# Altium PCB PCB1.PcbDoc
Units mm, origin at the board's own origin, x right, y up, seen from the top; angles counter-clockwise.
Board outline 85.01 x 50.25 mm, 2 copper layers (Top Layer, Bottom Layer); 30 components, 16 nets, 78 pads, 2 vias.
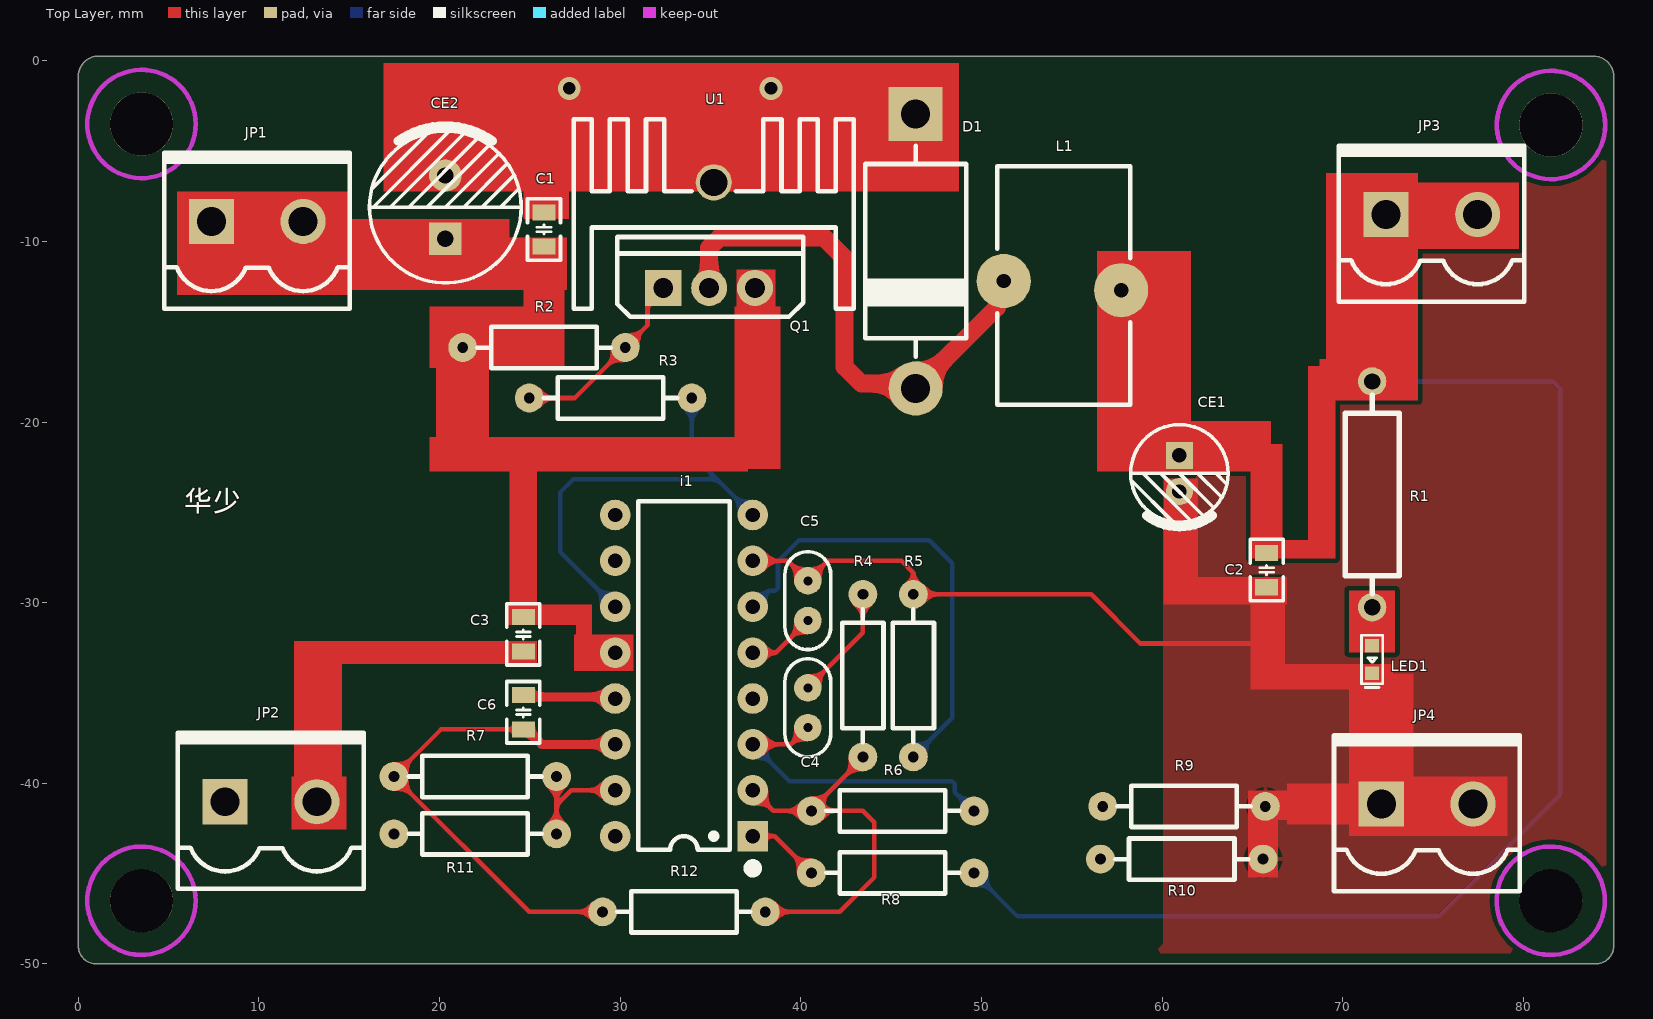
[diagram p0: Top Layer view]
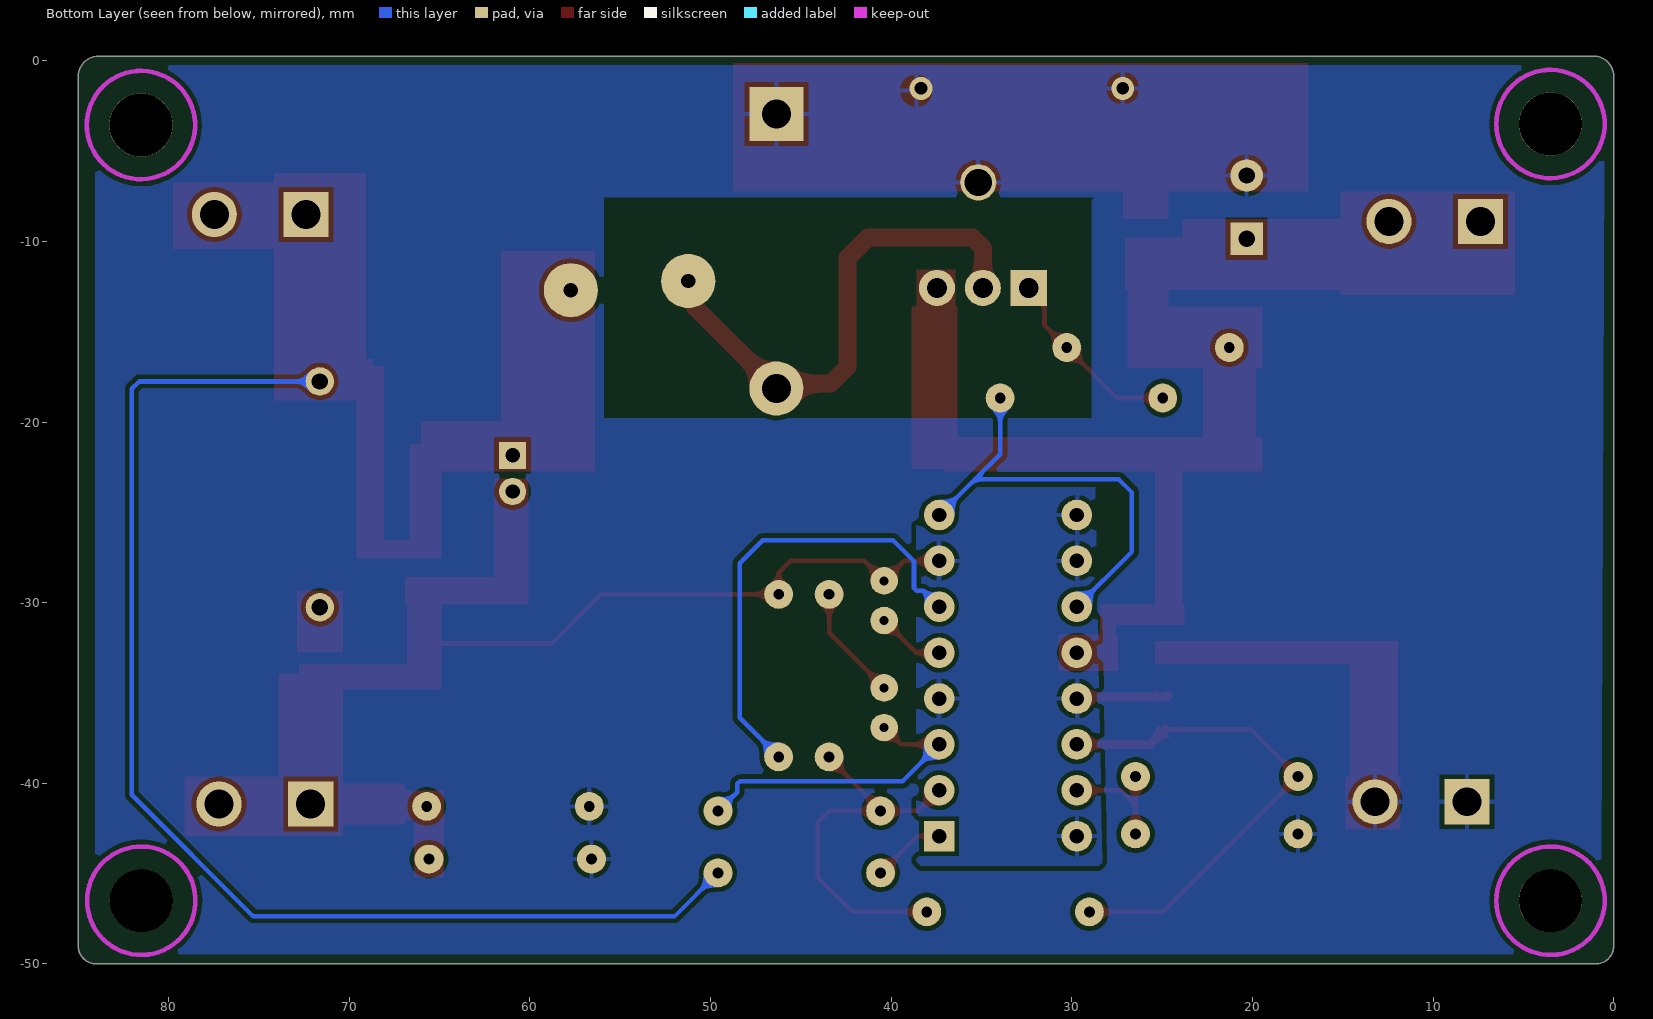
[diagram p1: Bottom Layer view, seen from below]

## Layer stack, top to bottom
Top Solder: solder mask 0.0102, Solder Resist, Dk 3.5
Top Layer: signal copper 0.0356
Dielectric 1: dielectric 0.32, FR-4, Dk 4.8
Bottom Layer: signal copper 0.0356
Bottom Solder: solder mask 0.0102, Solder Resist, Dk 3.5

## Board outline
0,-49 0,-1 cw(c1.127,-0.873) 1,0.254 84,0.254 cw(c83.865,-0.881) 85,-1.016 85,-49.016 cw(c84.008,-49.008) 84,-50 1,-50 cw(c1,-49)

## Design rules (kind name [scope] priority, off if disabled: settings)
Clearance [All] p1: gap=0.254 ignorepadtopadclearanceinfootprint=FALSE
PolygonConnect [All] p1: connectstyle=Relief reliefconductorwidth=0.254 reliefentries=4 polygonreliefangle="90 Angle" airgapwidth=0.254
RoutingVias [All] p1: holewidth=0.711 width=1.27 viastyle="Through Hole" minholewidth=0.711 minwidth=1.27 maxholewidth=0.711 maxwidth=1.27
SolderMaskExpansion [All] p1: expansion=0.05 istentingtop=FALSE useseparateexpansions=TRUE expansionbottom=0.05 istentingbottom=FALSE
SupplyNets "Schematic Supply Nets_3" [InNet('V-')] p1: voltage=0.000
SupplyNets "Schematic Supply Nets_2" [InNet('V+')] p2: voltage=0.000
SupplyNets "Schematic Supply Nets_1" [InNet('GND')] p3: voltage=0.000
SupplyNets "Schematic Supply Nets" [InNet('VCC')] p4: voltage=0.000
Width [All] p1: maxlimit=1.5 minlimit=0.254 preferedwidth=0.254
30 further rules are at their usual default settings.

## Classes and differential pairs
component class Sheet1: C2 C4 C5 C6 CE1 CE2 D1 i1 JP1 JP2 JP3 L1 LED1 Q1 R1 R2 R3 R4 R5 R6 R7 R8 R9 R10 R11 R12 U1

## Components (designator, comment, footprint, x,y, rotation, side; value= is the part's Value field where it differs from the comment)
C1 "1uF" C0805_L 25.781,-9.337 r270 top
C2 "1uF" C0805_L 65.786,-28.194 r90 top
C3 "1uF" C0805_L 24.638,-31.75 r270 top
C4 "104" "CC 2.2*5" 40.386,-35.814 r90 top
C5 "102" "CC 2.2*5" 40.386,-29.888 r270 top
C6 "1uF" C0805_L 24.638,-36.068 r90 top
CE1 "47uF/25V" CE-2.0*5*11 60.96,-22.844 r270 top
CE2 "100uF/50V" CE-3.5*8*11.5 20.32,-8.1 r90 top
D1 "MR850" DO-201AD 46.355,-10.541 r270 top
i1 "TL494" DIP16-300 33.528,-34.036 r180 top
JP1 "HDR-1X2" KF2EDGK5.08-LI-2P 9.906,-8.89 r0 top
JP2 "HDR-1X2" KF2EDGK5.08-LI-2P 10.668,-41.021 r0 top
JP3 "HDR-1X2" KF2EDGK5.08-LI-2P 74.93,-8.509 r0 top
JP4 "HDR-1X2" KF2EDGK5.08-LI-2P 74.676,-41.148 r0 top
L1 "1mH" LMR135 54.483,-12.192 r0 top
LED1 "红色" LED0603_R 71.628,-33.147 r270 top
Q1 "TIP32A" TO220A 34.925,-12.573 r0 top
R1 "150" "RS 1/2W" 71.628,-24.003 r90 top
R2 "47" "RS 1/4W" 25.781,-15.875 r0 top
R3 "150" "RS 1/4W" 29.464,-18.669 r0 top
R4 "47K" "RS 1/4W" 43.434,-34.036 r270 top
R5 "47K" "RS 1/4W" 46.228,-34.036 r90 top
R6 "1M" "RS 1/4W" 45.085,-41.529 r180 top
R7 "5.1K" "RS 1/4W" 21.971,-39.624 r180 top
R8 "5.1K" "RS 1/4W" 45.085,-44.958 r180 top
R9 "0.22" "RS 1/4W" 61.214,-41.275 r0 top
R10 "0.22" "RS 1/4W" 61.087,-44.196 r0 top
R11 "150" "RS 1/4W" 21.971,-42.799 r0 top
R12 "5.1K" "RS 1/4W" 33.528,-47.117 r0 top
U1 "15.5*10.5*21" PCBComponent_1 35.179,-6.604 r0 top

## Footprints (in the part's own frame and the unit in brackets; to place one, negate y for a bottom-side part, rotate by r counter-clockwise, add the part's x,y. Pads: shape width x height; smd on the part's side, far side on the other; paste and mask are expansions set on the pad)
C0805_L [mil] "贴片MLCC电容"
  rect 35x50 smd: 1(-37.4,0) 2(37.4,0)
  silkscreen extent -67,-36 67,36, body extent -39,-26 39,26, height 51
"CC 2.2*5" [mm] "脚距2.2mm直径5mm"
  round 1.524 hole 0.5: 1(-1.1,0) 2(1.1,0)
  silkscreen extent -2.71,-1.27 2.71,1.27, body extent -2.4,-0.92 2.4,0.92, height 4.8
CE-2.0*5*11 [mm] "直插电解电容-脚距2mm直径5mm高度11mm"
  rect 1.5x1.5 hole 0.8: 1(-1,0)
  round 1.5 hole 0.8: 2(1,0)
  silkscreen extent -2.7,-2.7 2.96,2.7, body extent -2.51,-2.45 2.5,2.55, height 2.94
CE-3.5*8*11.5 [mm] "脚距3.5mm直径8mm高度11.5mm                   联系卖家 免费查找封装"
  rect 1.8x1.8 hole 0.9: 1(-1.75,0)
  round 1.8 hole 0.9: 2(1.75,0)
  silkscreen extent -4.2,-4.2 4.5,4.2, body extent -4,-4 4.01,4, height 11.64
DIP16-300 [mm] "19.3*7.6*3.8(长宽高）"
  rect 1.7x1.7 hole 0.8: 1(-3.81,8.89)
  round 1.7 hole 0.8: 2(-3.81,6.35) 3(-3.81,3.81) 4(-3.81,1.27) 5(-3.81,-1.27) 6(-3.81,-3.81) 7(-3.81,-6.35) 8(-3.81,-8.89) 9(3.81,-8.89) 10(3.81,-6.35) 11(3.81,-3.81) 12(3.81,-1.27) 13(3.81,1.27) 14(3.81,3.81) 15(3.81,6.35) 16(3.81,8.89)
  silkscreen extent -4.06,-9.65 2.54,10.92, body extent -4.02,-9.65 4.02,9.65, height 4.3
DO-201AD [mm] "5.2*15.2mm(直径，脚距）"
  rect 3x3 hole 1.6: 1(-7.6,0)
  round 3 hole 1.6: 2(7.6,0)
  silkscreen extent -5.84,-2.79 5.84,2.79, body extent -8.25,-2.6 8.25,2.6, height 5.25
KF2EDGK5.08-LI-2P [mm] "立插端子"
  rect 2.5x2.5 hole 1.6: 1(-2.54,0)
  round 2.5 hole 1.6: 2(2.54,0)
  silkscreen extent -5.16,-4.83 5.13,3.81, body extent -5.08,-4.75 5.08,3.75, height 11.25
LED0603_R [mil] "红色0603LED"
  rect 30x30 smd: 1(-30,0) 2(30,0)
  silkscreen extent -53,-23 61,23, body extent -31,-16 32,16, height 18
LMR135 [mm] "磁环电感，外径13mm，厚度5mm"
  round 3 hole 0.8: 1(-3.25,0) 2(3.25,-0.508)
  silkscreen extent -3.61,-6.86 3.76,6.35, body extent -3.45,-6.75 3.55,6.25, height 12.5
PCBComponent_1 [mm]
  round 2 hole 1.5 paste-2539.97: 1(0,-0.127)
  silkscreen extent -7.75,-7.13 7.75,3.37
"RS 1/2W" [mm] "直插色环电阻，脚距12.5mm，直径3mm"
  round 1.575 hole 0.9: 1(-6.25,0) 2(6.25,0)
  silkscreen extent -5.5,-1.5 5.5,1.5, body extent -6.5,-1.51 6.5,1.51, height 3.11
"RS 1/4W" [mm] "直插色环电阻，脚距9mm，直径2.3mm"
  round 1.6 hole 0.6: 1(-4.5,0) 2(4.5,0)
  silkscreen extent -3.68,-1.14 3.68,1.14, body extent -4.72,-1.16 4.73,1.16, height 2.32
TO220A [mm] "220，3脚晶体管"
  rect 2x2 hole 1.1: 1(-2.54,0)
  round 2 hole 1.1: 2(0,0) 3(2.54,0)
  silkscreen extent -5.08,-1.6 5.21,2.82, body extent -5.15,-1.53 5.15,2.9, height 18.5

## Part data
C1 C2 C3 C6: library part C, "贴片电容/MLCC电容", BOM名称=无极性贴片电容, 当前库版本V2022.12.25 @淘宝卖家:黄晶宝石=最新版本发布https://shop463601444.taobao.com
C4 C5: library part CC, "瓷片电容", BOM名称=直插瓷片电容, 当前库版本V2022.12.25 @淘宝卖家:黄晶宝石=最新版本发布https://shop463601444.taobao.com
CE1 CE2: library part CE, "直插电解电容", BOM名称=直插电解电容, 当前库版本V2022.12.25 @淘宝卖家:黄晶宝石=最新版本发布https://shop463601444.taobao.com
D1: library part FR307, "恢复二极管整流器", BOM名称=恢复二极管整流器, 当前库版本V2022.12.25 @淘宝卖家:黄晶宝石=最新版本发布https://shop463601444.taobao.com
i1: "电源管理IC", BOM名称=电源管理IC, 当前库版本V2022.12.25 @淘宝卖家:黄晶宝石=最新版本发布https://shop463601444.taobao.com
JP1 JP2 JP3 JP4: library part "Header 2", "2P接插件", BOM名称=2P接插件, 联系下单店铺卖家 免费帮你查找封装=最新版本发布https://shop463601444.taobao.com
L1: library part L-MR, "功率磁环电感", BOM名称=功率磁环电感, 学习资源=www.ooocke.com, 版权归属=源创客
LED1: library part LED, "贴片LED", BOM名称=贴片LED, 封装库来自淘宝卖家：黄晶宝石=其他店铺购入均为盗版封装库，无更新权益，请立即申请退款，本店现金奖励200~1000元
Q1: library part TIP42C, "PNP型中功率三极管", BOM名称=互补功率-PNP型, 参数="100V 6A 65W", 联系下单店铺卖家 免费帮你查找封装="联系下单店铺卖家 免费技术支持"
R1 R2 R3 R4 R5 R6 R7 R8 R9 R10 R11 R12: library part R-DIP, "直插色环电阻", BOM名称=色环电阻, 当前库版本V2022.12.25 @淘宝卖家:黄晶宝石=最新版本发布https://shop463601444.taobao.com
U1: "产品尺寸:15.5*10.5*21MM;材 质:6063-T5;", Colour=白色, JLCPCB Part Class="Extended Part", LCSC Part Name="XSD(鑫顺达)to-220 to-247二极管铝型材散热片 15.5*10.5*21 本色带针大功率电子散热器（可定制）", Manufacturer=XSD(鑫顺达), AddInBom=yes, ConvertToPcb=yes, Datasheet=https://item.szlcsc.com/datasheet/15.5*10.5*21/5057.html, Device=15.5*10.5*21, FootprintName=SINK-TH_L15.0-W10.5-H21.0, ManufacturerPart=15.5*10.5*21, ModelId=02f8db79302448c8bc255cc575379e90聨0819f05c4eef4c71ace90d822a990e87, ModelName=SINK-TH_L15.5-W10.5-H21.0, ModelTransform=610.416,413.38343,0,0,0,0,0,-51.181,-137.795, NumberOfHoles=-, NumberOfNails=-, NumberOfTeeth=-, ProductSize=15.5*10.5*21MM, Shape=H型, Supplier=LCSC, Supplier Footprint=-, SupplierPart=C4649, SurfaceTreatment=本色洗白, Symbol=15*10.5*21, TextureOfMaterial=6063-T5

## Free pads (board coordinates)
  round 3.5 hole 3.5 unplated: 4(3.5,-46.5) 4(3.5,-3.5) 4(81.514,-46.5) 4(81.534,-3.556)

## Via types
v1: diameter 1.27, hole 0.711, Top Layer to Bottom Layer, tented both sides, 2 vias

## Nets (pads, with @x,y where several pads share a name; then routed paths per layer and width w, separated by ;. In a path a pad name is that pad's centre, name@x,y a point inside that pad or via, vN(x,y) a via of type N, cw(c..) or ccw(c..) an arc to the next point about the centre after c; other vN are vias at no path point)
GND: C1.1 C3.2 CE2.2 D1.1 JP2.1 JP2.2 R9.1 R10.1 R11.1 U1.1
  other v1: 27.178,-1.524 38.354,-1.524
NetC4_1: C4.1 i1.3 R6.1 | length 17.5
  Top Layer w0.254: i1.3 39.454,-37.846 C4.1
  Bottom Layer w0.254: i1.3 39.37,-39.878 48.365,-39.878 48.514,-40.027 48.514,-40.491 48.717,-40.694 48.75,-40.694 R6.1
NetC4_2: C4.2 R4.1 | length 6.4
  Top Layer w0.254: C4.2 43.434,-31.666 R4.1
NetC5_2: C5.2 i1.5 | length 3.8
  Top Layer w0.254: i1.5 38.608,-32.766 C5.2
NetC6_1: C6.1 i1.14 R7.2 R12.1 | length 28.1
  Top Layer w0.254: C6.1 20.077,-37.018 R7.2 24.964,-47.117 R12.1
  Top Layer w0.5: C6.1@24.829,-37.018 25.656,-37.846 i1.14
NetD1_2: D1.2 L1.1 Q1.2 | length 28.8
  Top Layer w1: Q1.2 34.925,-10.365 35.511,-9.779 41.275,-9.779 42.418,-10.922 42.418,-16.94 43.355,-17.877 46.091,-17.877 D1.2 50.85,-13.646 50.85,-12.575 L1.1
Neti1_1: i1.1 R8.2 | length 4.1
  Top Layer w0.254: i1.1 38.553,-42.926 R8.2
Neti1_2: i1.2 R4.2 R6.2 R12.2 | length 21.5
  Top Layer w0.254: i1.2 38.481,-41.529 R6.2 ; R12.2 42.164,-47.117 44.069,-45.212 44.069,-42.164 43.434,-41.529 R6.2 ; R4.2 43.434,-38.608 40.585,-41.457 R6.2
Neti1_6: i1.6 R5.1 | length 25.6
  Bottom Layer w0.254: i1.6 38.227,-29.337 38.586,-29.337 38.735,-29.188 38.735,-27.708 39.9,-26.543 47.117,-26.543 48.387,-27.813 48.387,-36.377 R5.1
Neti1_8: i1.8 i1.11 R3.2 | length 24.5
  Bottom Layer w0.254: i1.11 26.67,-27.178 26.67,-23.898 27.39,-23.178 35.37,-23.178 ; R3.2 33.964,-21.772 35.37,-23.178 ; i1.8 35.37,-23.178
Neti1_15: i1.15 R7.1 R11.2 | length 6.8
  Top Layer w0.254: R11.2 26.471,-41.212 ; R7.1 26.471,-41.212 ; i1.15 27.297,-40.386 26.471,-41.212
NetLED1_1: LED1.1 R1.1
NetQ1_1: Q1.1 R2.2 R3.1 | length 10.6
  Top Layer w0.254: R3.1 27.487,-18.669 R2.2 31.512,-14.644 31.512,-13.446 Q1.1
V+: C2.2 CE1.1 JP3.1 JP3.2 L1.2 R1.2 R8.1 | length 69.6
  Top Layer w0.254: C2.2@65.598,-27.432 C2.2
  Bottom Layer w0.254: R8.1 51.998,-47.371 75.311,-47.371 82.042,-40.64 82.042,-18.161 81.634,-17.753 R1.2
V-: C2.1 C5.1 C6.2 CE1.2 i1.4 i1.7 i1.9 i1.10 i1.13 i1.16 JP4.1 JP4.2 LED1.2 R5.2 R9.2 R10.2 | length 36.6
  Top Layer w0.254: i1.7 39.284,-27.686 C5.1 41.488,-27.686 45.571,-27.686 46.228,-28.343 R5.2 56.079,-29.536 58.801,-32.258 65.278,-32.258
  Top Layer w0.5: C6.2 24.732,-35.212 29.624,-35.212 i1.13
VCC: C1.2 C3.1 CE2.1 i1.12 JP1.1 JP1.2 Q1.3 R2.1

## Polygon pours and split planes (outlines as drawn)
GND on Bottom Layer "GND_L02_P006" (solid, remove dead copper, pour order 6): 0.508,-0.254 84.074,-0.254 84.074,-49.276 84.201,-49.403 84.138,-49.466 0.699,-49.466
V- on Bottom Layer "V-_L02_P001" (solid, remove dead copper, pour order 1): 28.702,-23.622 38.608,-23.622 38.608,-44.323 38.354,-44.577 28.321,-44.577
V- on Top Layer "V-_L01_P007" (solid, remove dead copper, pour order 7): 60.071,-0.127 60.071,-48.895 59.563,-49.403 84.582,-49.403 84.582,-0.889 84.074,-0.381

## Keep-outs
Keep-Out Layer:
  circle w0.254: c81.514,-46.5 r3
  circle w0.254: c81.534,-3.556 r3
  circle w0.254: c3.5,-46.5 r3
  circle w0.254: c3.5,-3.5 r3

## Other copper
Top Layer:
  rectangle net GND: 11.938,-40.894 14.605,-32.131
  rectangle net GND: 11.811,-42.545 14.859,-39.624
  rectangle net GND: 12.446,-33.401 25.4,-32.131
  rectangle net GND: 24.638,-8.763 27.178,-6.604
  rectangle net GND: 16.891,-7.239 48.768,-0.127
  rectangle net V+: 70.612,-10.414 79.756,-6.731
  rectangle net V+: 69.088,-18.796 74.168,-6.223
  rectangle net VCC: 27.559,-32.258 28.448,-30.48
  rectangle net VCC: 23.749,-31.242 28.448,-30.099
  rectangle net VCC: 27.432,-33.782 30.734,-31.75
  rectangle net VCC: 23.876,-31.115 25.4,-22.098
  rectangle net VCC: 36.449,-14.097 38.608,-11.557
  rectangle net VCC: 36.322,-22.606 38.862,-13.589
  rectangle net VCC: 19.431,-22.733 37.084,-20.828
  rectangle net VCC: 19.812,-21.717 22.733,-14.859
  rectangle net VCC: 19.431,-17.018 26.924,-13.589
  rectangle net VCC: 24.638,-14.097 26.924,-12.065
  rectangle net VCC: 23.241,-12.7 27.051,-9.779
  rectangle net VCC: 14.605,-12.7 23.876,-8.763
  rectangle net VCC: 5.461,-12.954 15.113,-7.239
  rectangle net V-: 60.071,-30.099 61.976,-23.114
  rectangle net V-: 64.77,-45.212 66.421,-40.386
  rectangle net V-: 66.929,-42.291 74.041,-40.005
  rectangle net V-: 70.739,-42.926 79.121,-39.624
  rectangle net V-: 70.358,-42.926 73.914,-33.909
  rectangle net V-: 66.167,-34.798 68.58,-33.401
  rectangle net V-: 64.897,-42.037 67.437,-40.386
  rectangle net V-: 68.199,-34.798 72.771,-33.401
  rectangle net V-: 64.897,-34.798 66.802,-28.956
  rectangle net V-: 60.579,-30.099 66.929,-28.575
  rectangle net NetLED1_1: 70.358,-32.766 72.898,-29.337
  rectangle net V+: 65.532,-27.559 69.469,-26.543
  rectangle net V+: 68.072,-27.559 69.596,-16.891
  rectangle net V+: 68.707,-18.669 73.533,-16.51
  rectangle net V+: 64.897,-27.559 66.675,-21.209
  rectangle net V+: 59.69,-22.733 66.04,-19.939
  rectangle net V+: 56.388,-22.733 61.595,-10.541
  pour cut-out: 28.829,-7.62 28.956,-7.747 28.956,-19.812 55.88,-19.812 55.88,-7.62
Bottom Layer:
  pour cut-out: 28.796,-7.582 28.923,-7.709 28.923,-19.774 55.88,-19.774 55.88,-7.582

## Silkscreen, mask and mechanical layers (free items; w line width, h text height)
Top Overlay:
  text "华少" at 5.842,-25.321 h2
Mechanical 1:
  the board outline again, w0.254